# Altium PCB Square_1.PcbDoc
Units mil, origin at the board's own origin, x right, y up, seen from the top; angles counter-clockwise.
Board outline 4448.82 x 275.59 mil, 2 copper layers (Top Layer, Bottom Layer); 17 components, 12 nets, 36 pads, 21 vias.
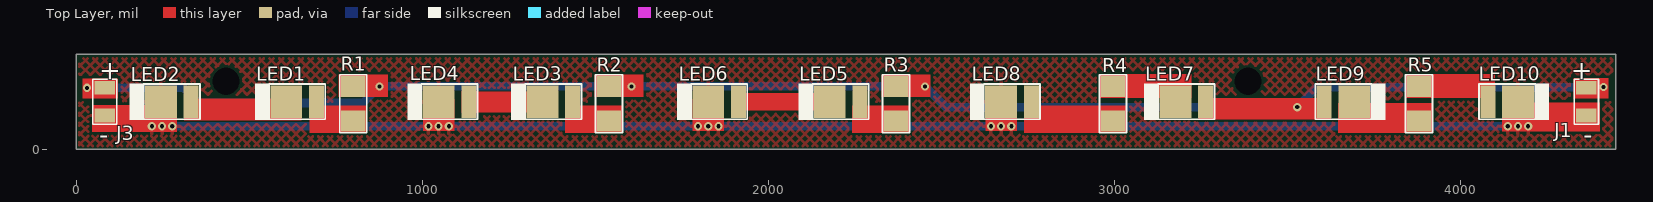
[diagram p0: Top Layer view]
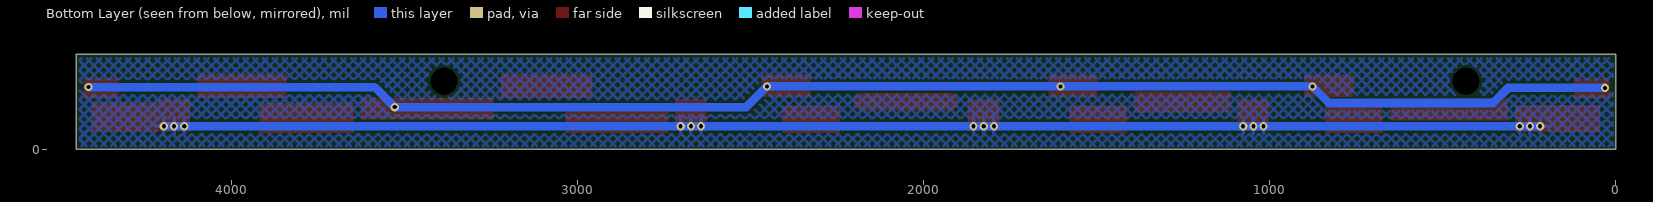
[diagram p1: Bottom Layer view, seen from below]

## Layer stack, top to bottom
Top Solder: solder mask 0.4, Solder Resist, Dk 3.5
Top Layer: signal copper 1.4
Dielectric 1: dielectric 12.6, FR-4, Dk 4.8
Bottom Layer: signal copper 1.4
Bottom Solder: solder mask 0.4, Solder Resist, Dk 3.5

## Board outline
0,0 4448.82,0 4448.82,275.59 0,275.59

## Design rules (kind name [scope] priority, off if disabled: settings)
Clearance [All] p1: gap=7 ignorepadtopadclearanceinfootprint=FALSE except(0: Arc-Hole Track-Hole SMDPad-Hole THPad-Hole Via-Hole Fill-Hole Poly-Hole Region-Hole Text-Hole)
ComponentClearance [All] p1: gap=0 collisioncheckmode=3 verticalgap=0 showdistances=FALSE
HoleSize [All] p1: absolutevalues=TRUE maxlimit=1000 minlimit=1 maxpercent=80.000 minpercent=20.000
HoleToHoleClearance [All] p1: gap=0 allowstackedmicrovias=TRUE
MinimumSolderMaskSliver [All] p1: minsoldermaskwidth=0
PolygonConnect [All] p1: connectstyle=Relief reliefconductorwidth=10 reliefentries=4 polygonreliefangle="90 Angle" airgapwidth=10
RoutingVias [All] p1: holewidth=11.81 width=23.62 viastyle="Through Hole" minholewidth=7.87 minwidth=17.72 maxholewidth=11.81 maxwidth=23.62
SilkToSilkClearance [All] p1: silktosilkclearance=0
SilkToSolderMaskClearance [IsPad] p1: minsilkscreentomaskgap=0 clearancetoexposedcopper=TRUE
SolderMaskExpansion SolderMaskExpansion_1 [Not IsVia] p1: expansion=4
SolderMaskExpansion [IsVia] p2: expansion=4 soldermaskfromhole=TRUE
Width [All] p1: maxlimit=100 minlimit=10 preferedwidth=10 minimp=50.000000 maximp=50.000000 favimp=50.000000
24 further rules are at their usual default settings.

## Components (designator, comment, footprint, x,y, rotation, side; value= is the part's Value field where it differs from the comment)
J1 "SMD PADS" "SMD PAD" 4363,138 r270 top locked
J3 "SMD PADS" "SMD PAD" 83,138 r270 top locked
LED1 "White LED" "White LED" 651,138 r180 top locked value=Custom
LED2 "White LED" "White LED" 289,138 r180 top locked value=Custom
LED3 "White LED" "White LED" 1391,138 r180 top locked value=Custom
LED4 "White LED" "White LED" 1091,138 r180 top locked value=Custom
LED5 "White LED" "White LED" 2221,138 r180 top locked value=Custom
LED6 "White LED" "White LED" 1870,138 r180 top locked value=Custom
LED7 "White LED" "White LED" 3220,138 r180 top locked value=Custom
LED8 "White LED" "White LED" 2716,138 r180 top locked value=Custom
LED9 "White LED" "White LED" 3649,138 r0 top locked value=Custom
LED10 "White LED" "White LED" 4122,138 r0 top locked value=Custom
R1 "5R1" Res1206 801,132 r90 top locked
R2 "5R1" Res1206 1540,132 r90 top locked
R3 "5R1" Res1206 2369,132 r90 top locked
R4 "5R1" Res1206 2996,132 r90 top locked
R5 "5R1" Res1206 3880,132 r270 top locked

## Footprints (in the part's own frame and the unit in brackets; to place one, negate y for a bottom-side part, rotate by r counter-clockwise, add the part's x,y. Pads: shape width x height; smd on the part's side, far side on the other; paste and mask are expansions set on the pad)
Res1206 [mil]
  rect 60x70 smd: 1(-50,0) 2(50,0)
  silkscreen extent -84,-39 84,39, body extent -63,-31 63,32, height 39
"SMD PAD" [mil] "SMD 0805"
  rect 40x60 smd: 1(-40,0) 2(40,0)
  silkscreen extent -65,-35 65,35
"White LED" [mm]
  rect 2.33x2.38 smd: 1(1.108,0)
  rect 1.1x2.38 smd: 2(-1.107,0)
  silkscreen extent -1.75,-1.35 3.4,1.35

## Part data
J1 J3: library part "SMD PAD"
LED1 LED2 LED3 LED4 LED5 LED6 LED7 LED8 LED9 LED10: library part HL-AM-2835H421W-S1-08-HR6(SDCM<6)(2800K-3100K)60mA, "White 2800K~3100K 2.8V~3.4V SMD,3.5x2.8x0.7mm Light Emitting Diodes (LED) RoHS", Manufacturer="HONGLITRONIC(Hongli Zhihui (HONGLITRONIC))", Package=Custom, ComponentLink1Description="Supplier Link", ComponentLink1URL=https://lcsc.com/product-detail/Light-Emitting-Diodes-LED_HONGLITRONIC-Hongli-Zhihui-HONGLITRONIC-HL-AM-2835H421W-S1-08-HR6-SDCM-6-2800K-3100K-60mA_C516131.html, Manufacturer Part No=HL-AM-2835H421W-S1-08-HR6(SDCM<6)(2800K-3100K)60mA
R1 R2 R3 R4 R5: library part 1206W4J051JT5E, "RES SMD 5.1O ±5% 0.25W 1206", Manufacturer="UNI-ROYAL(Uniroyal Elec)", Package=1206, Power(Watts)=0.25W, Resistance=5.1O, Temperature Coefficient=±400ppm/?, Tolerance=±5%

## Free pads (board coordinates)
  round 0 hole 78.74 unplated: 1(433.07,196.85) 1(3385.83,196.85)

## Via types
v1: diameter 23.62, hole 11.81, Top Layer to Bottom Layer, tented both sides, 21 vias

## Nets (pads, with @x,y where several pads share a name; then routed paths per layer and width w, separated by ;. In a path a pad name is that pad's centre, name@x,y a point inside that pad or via, vN(x,y) a via of type N, cw(c..) or ccw(c..) an arc to the next point about the centre after c; other vN are vias at no path point)
GND: J1.2 J3.2 LED2.1 LED4.1 LED6.1 LED8.1 LED10.1 | length 4043.2
  Top Layer w25: J3.2 146,98 ; v1@214,63 v1@214,67
  Bottom Layer w25: v1(219,67) v1(1077,67) v1(1856,67) v1(2702,67) v1(4195.2,67)
  other v1: 248.5,67 278,67 1018,67 1047.5,67 1797,67 1826.5,67 2643,67 2672.5,67 4136.2,67 4165.7,67
LED_IN: J1.1 J3.1 LED7.2 LED9.2 R1.2 R2.2 R3.2 | length 4794.8
  Top Layer w25: v1(32,178) J3.1 ; R1.2 v1(877,182) ; R2.2 v1(1605,182) ; R3.2 v1(2453,182) ; J1.1 4365,180 v1(4413,180)
  Bottom Layer w25: v1(32,178) 311,178 355,134 829,134 v1(877,182) v1(1605,182) v1(2453,182) 2513,122 v1(3528,122) 3586,180 v1(4413,180)
NetLED1_1: LED1.1 LED2.2
NetLED1_2: LED1.2 R1.1
NetLED3_1: LED3.1 LED4.2
NetLED3_2: LED3.2 R2.1
NetLED5_1: LED5.1 LED6.2 | length 252.4
  Top Layer w50: LED6.2@1925,138 LED5.1
NetLED5_2: LED5.2 R3.1
NetLED7_1: LED7.1 R4.2
NetLED8_2: LED8.2 R4.1
NetLED9_1: LED9.1 R5.2
NetLED10_2: LED10.2 R5.1

## Polygon pours and split planes (outlines as drawn)
GND on Top Layer "GND_L01_P002" (hatched 45Degree grid 20 track 8, remove dead copper, pour order 2): 9,263 4438,263 4438,10 9,10
no net on Top Layer (solid, pour order 0): 0,275
GND on Bottom Layer "GND_L02_P006" (hatched 45Degree grid 20 track 8, remove dead copper, pour order 6): 9,263 4438,263 4438,10 9,10

## Other copper
Top Layer:
  rectangle net NetLED1_1: 312,84 652,147
  rectangle net NetLED3_1: 1114,106 1391,167
  region net LED_IN: 121,205 19,205 19,147 121,147
  rectangle net LED_IN: 759,151 901,217
  rectangle net LED_IN: 1498,151 1640,217
  rectangle net LED_IN: 4326,147 4427,206
  rectangle net LED_IN: 2327,151 2469,217
  rectangle net GND: 4120.2,53 4211.2,145
  rectangle net GND: 2627,53 2718,145
  rectangle net GND: 1781,53 1872,145
  rectangle net GND: 1002,53 1093,145
  region net NetLED7_1: 3222,218 2957,218 2957,148 3222,148
  region net NetLED10_2: 4100,218 3841,218 3841,148 4100,148
  rectangle net GND: 4120,52 4402,136
  rectangle net NetLED9_1: 3646,48 3919,134
  rectangle net NetLED8_2: 2738,48 3035,127
  rectangle net NetLED5_2: 2242,48 2408,127
  rectangle net NetLED1_2: 674,48 840,127
  rectangle net LED_IN: 3243,87 3626,148
  rectangle net NetLED3_2: 1413,48 1579,127
  rectangle net GND: 46,50 292,129

## Silkscreen, mask and mechanical layers (free items; w line width, h text height)
Top Overlay:
  text "+" at 67,203 h55
  text "+" at 4381.82,203 h55
  text "-" at 67,17 h55
  text "-" at 4381.82,17 h55
Mechanical 2:
  lines w10: 3385.83,275.59 4448.82,275.59 ; 4448.82,137.8 0,137.8 0,275.59 ; 0,275.59 4448.82,275.59 ; 0,275.59 0,0 4448.82,0 4448.82,275.59